# Altium PCB AFC_AVR.PcbDoc
Units mil, origin at the board's own origin, x right, y up, seen from the top; angles counter-clockwise.
Board outline 1560 x 2150 mil, 2 copper layers (Top Layer, Bottom Layer); 18 components, 14 nets, 95 pads, 2 vias.
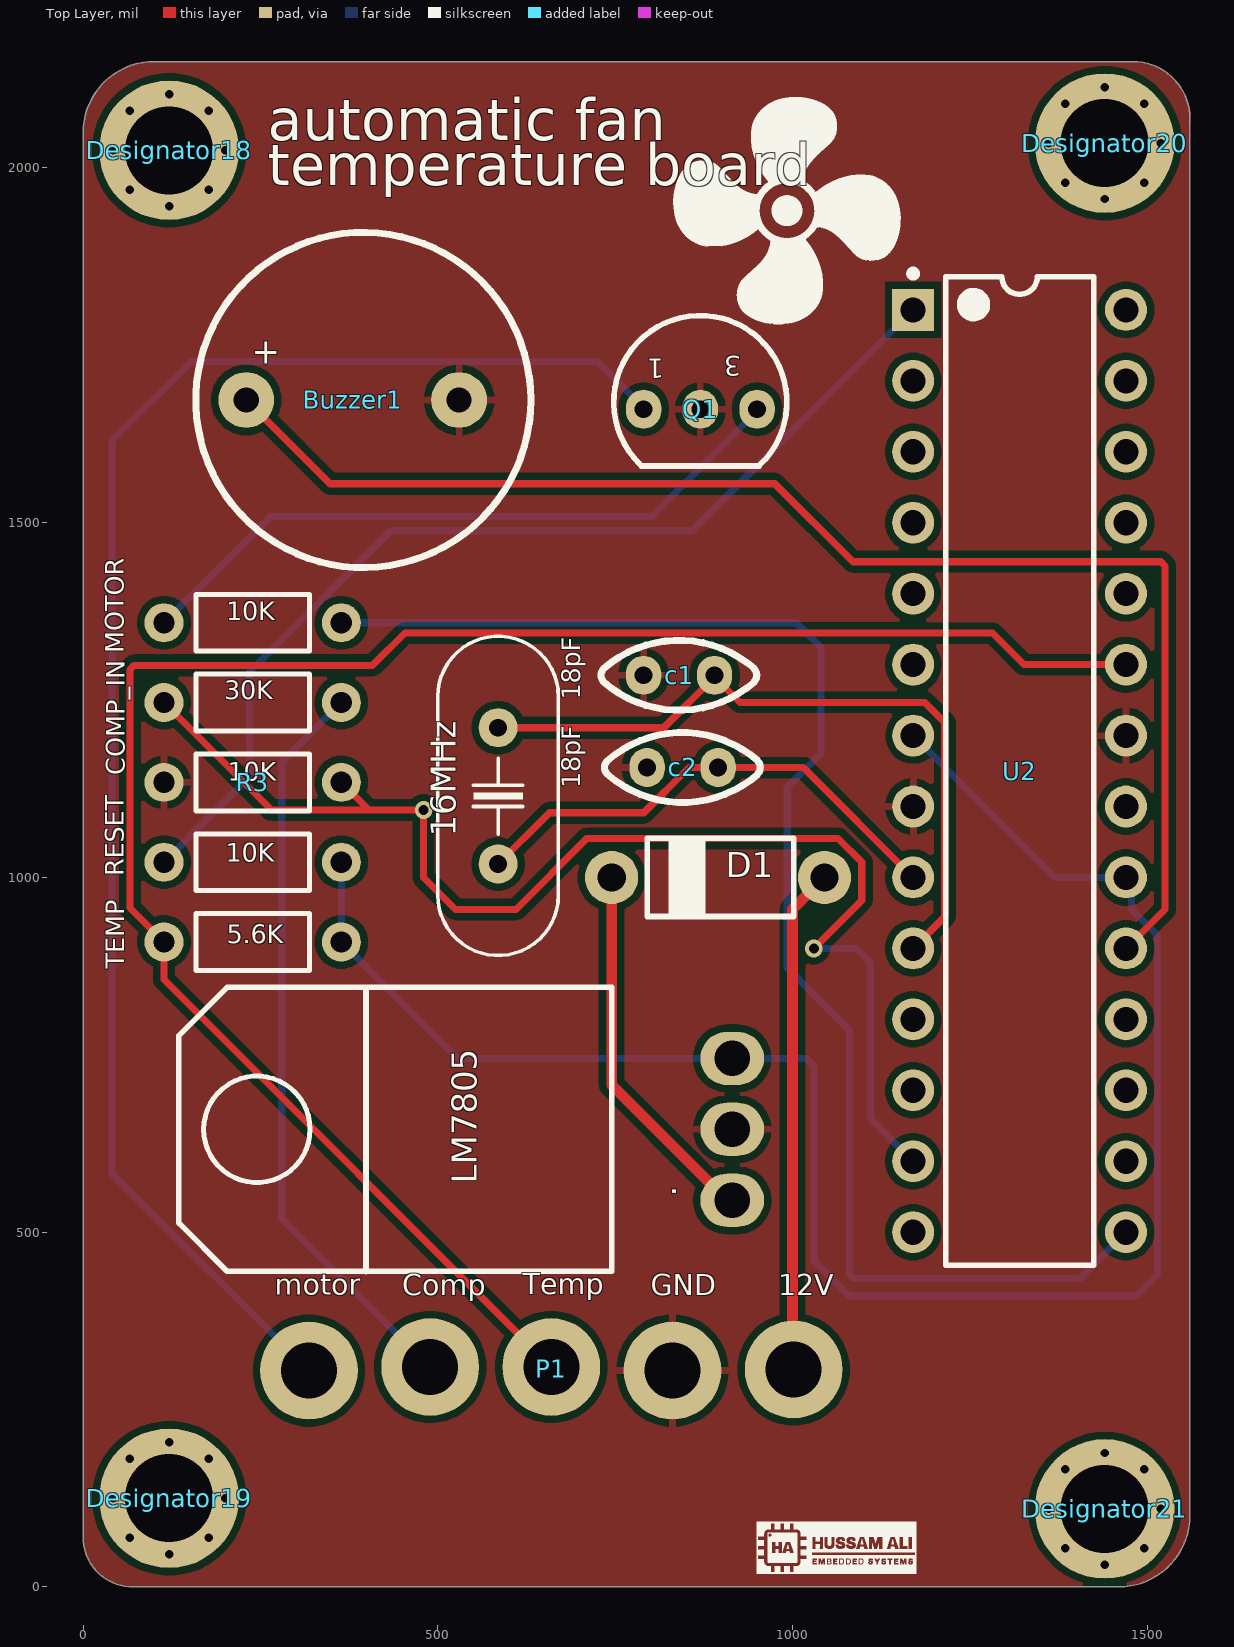
[diagram p0: Top Layer view]
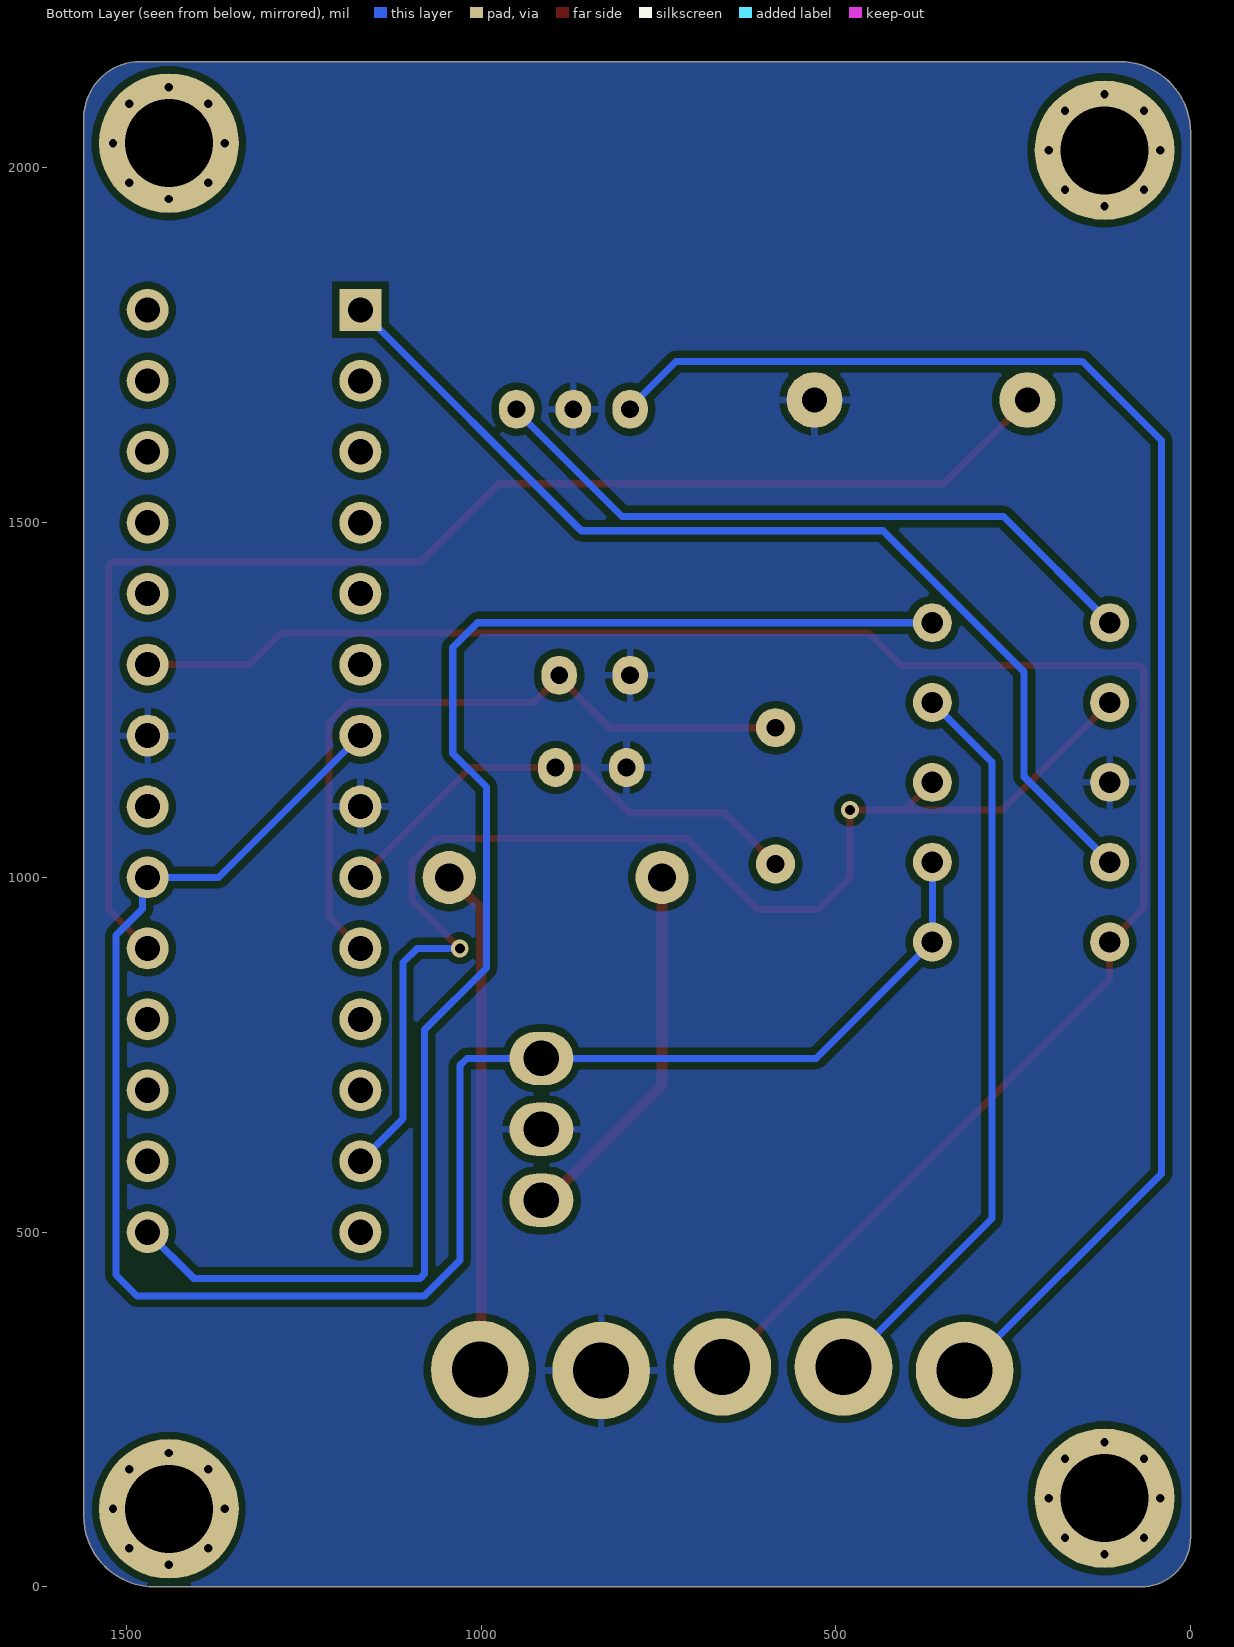
[diagram p1: Bottom Layer view, seen from below]
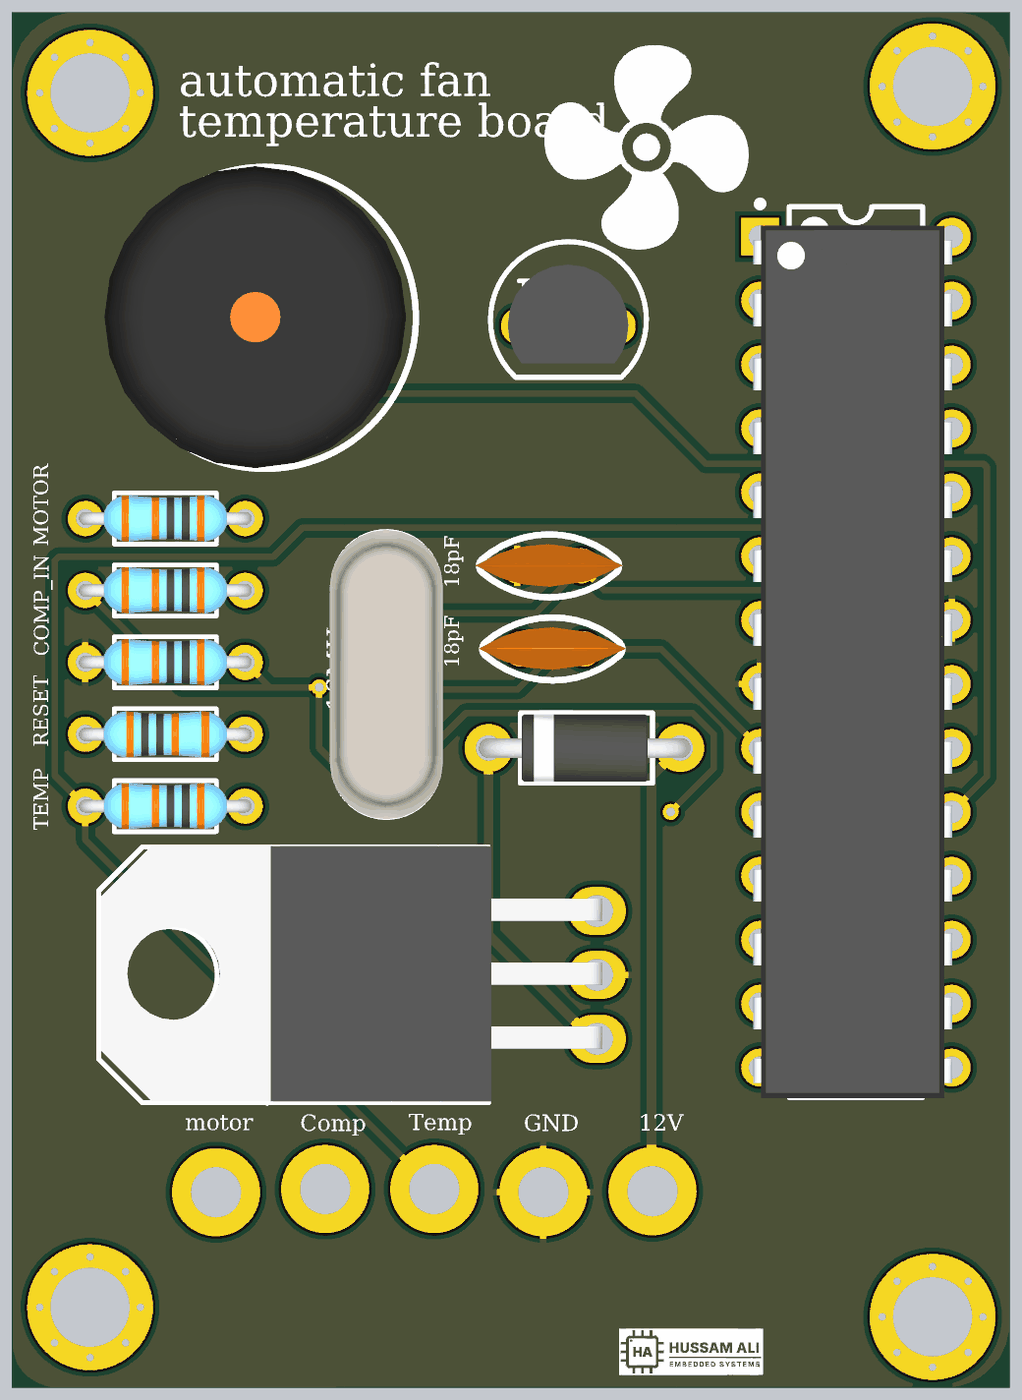
[diagram p2: 3D render of the assembled board from above, using the file's embedded part models]

## Layer stack, top to bottom
Top Solder: solder mask 0.4, Solder Resist, Dk 3.5
Top Layer: signal copper 1.4
Dielectric 1: dielectric 12.6, FR-4, Dk 4.8
Bottom Layer: signal copper 1.4
Bottom Solder: solder mask 0.4, Solder Resist, Dk 3.5

## Board outline
0,2050 cw(c100,2050) 100,2150 1480,2150 cw(c1480,2070) 1560,2070 1560,100 cw(c1460,100) 1460,0 110,0 70,0 cw(c70,70) 0,70

## Design rules (kind name [scope] priority, off if disabled: settings)
Clearance [All] p1: gap=10 ignorepadtopadclearanceinfootprint=FALSE
HoleSize [All] p1: absolutevalues=TRUE maxlimit=200 minlimit=1 maxpercent=80.000 minpercent=20.000
HoleToHoleClearance [All] p1: gap=1 allowstackedmicrovias=TRUE
MinimumSolderMaskSliver [All] p1: minsoldermaskwidth=1
PolygonConnect [All] p1: connectstyle=Relief reliefconductorwidth=10 reliefentries=4 polygonreliefangle="90 Angle" airgapwidth=10
RoutingVias [All] p1: holewidth=14 width=25 viastyle="Through Hole" minholewidth=14 minwidth=25 maxholewidth=14 maxwidth=25
SilkToSilkClearance [All] p1: silktosilkclearance=1
SilkToSolderMaskClearance [IsPad] p1: minsilkscreentomaskgap=1 clearancetoexposedcopper=TRUE
SolderMaskExpansion [All] p1: expansion=4 istentingtop=FALSE
Width [All] p1: maxlimit=35 minlimit=10 preferedwidth=10 minimp=50.000000 maximp=50.000000 favimp=50.000000
25 further rules are at their usual default settings.

## Classes and differential pairs
component class AFC_AVR: 16MHz Buzzer1 c1 c2 COMP_IN D1 LM7805 MOTOR P1 Q1 R3 RESET TEMP U2

## Components (designator, comment, footprint, x,y, rotation, side; value= is the part's Value field where it differs from the comment)
16MHz "11.0592 MHz" "XTAL Small" 585,1115 r270 top
Buzzer1 "Buzzer" BUZZER 395,1673 r0 top
c1 "18pF" "Cap - 100nF" 840,1285 r180 top
c2 "18pF" "Cap - 100nF" 845,1155 r180 top
COMP_IN "30K" Res-(1/4) 239,1246.5 r180 top (schematic designator R4)
D1 "1N4148" Diode-1n4001 1045,1000 r180 top
Designator18 "Comment" "Board Screw_No Silk" 121.26,2025 r0 top
Designator19 "Comment" "Board Screw_No Silk" 121.26,125 r0 top
Designator20 "Comment" "Board Screw_No Silk" 1440,2035 r0 top
Designator21 "Comment" "Board Screw_No Silk" 1440,110 r0 top
LM7805 "L78XXCV" "78XXCV - Right" 915,645 r90 top
MOTOR "10K" Res-(1/4) 239,1359 r180 top (schematic designator R5)
P1 "Header 5" HDR1X5 1001.58,306.54 r180 top
Q1 "C945" C945 870,1660 r180 top
R3 "10K" Res-(1/4) 239,1134 r180 top
RESET "10K" Res-(1/4) 239,1021.5 r0 top (schematic designator R2)
TEMP "5.6K" Res-(1/4) 239,909 r180 top (schematic designator R1)
U2 "ATmega328-PU" 28P3 1320,1150 r0 top

## Footprints (in the part's own frame and the unit in brackets; to place one, negate y for a bottom-side part, rotate by r counter-clockwise, add the part's x,y. Pads: shape width x height; smd on the part's side, far side on the other; paste and mask are expansions set on the pad)
28P3 [mm] "28-Pin Plastic Dual In-Line Package (PDIP)"
  rect 1.5x1.5 hole 0.9: 1(-3.81,16.51)
  round 1.5 hole 0.9: 2(-3.81,13.97) 3(-3.81,11.43) 4(-3.81,8.89) 5(-3.81,6.35) 6(-3.81,3.81) 7(-3.81,1.27) 8(-3.81,-1.27) 9(-3.81,-3.81) 10(-3.81,-6.35) 11(-3.81,-8.89) 12(-3.81,-11.43) 13(-3.81,-13.97) 14(-3.81,-16.51) 15(3.81,-16.51) 16(3.81,-13.97) 17(3.81,-11.43) 18(3.81,-8.89) 19(3.81,-6.35) 20(3.81,-3.81) 21(3.81,-1.27) 22(3.81,1.27) 23(3.81,3.81) 24(3.81,6.35) 25(3.81,8.89) 26(3.81,11.43) 27(3.81,13.97) 28(3.81,16.51)
  silkscreen extent -3.93,-17.7 2.65,17.93, body extent -4.08,-17.72 3.82,16.95, height 4.57
"78XXCV - Right" [mil]
  oval 75x90 hole 50: 1(-100,0) 2(100,0) 3(0,0)
  silkscreen extent -201,170 200,780, body extent -198,-8 202,776, height 175
"Board Screw_No Silk" [mm]
  round 0.6 hole 0.3: S(-2,0) S(-1.414,-1.414) S(-1.414,1.414) S(0,-2) S(0,2) S(1.414,-1.414) S(1.414,1.414) S(2,0)
  round 5 hole 3.15 mask+0.1: S(0,0)
BUZZER [mm]
  round 2 hole 0.9: 1(-4.191,0) 2(3.429,0)
  silkscreen extent -6,-6 6,6, body extent -6.38,-5.97 5.62,6.02, height 9.53
C945 [mil]
  oval 50x55 hole 25: 1(80,0) 2(0,0) 3(-80,0)
  silkscreen extent -122,-132 122,80, body extent -94,-96 95,58, height 236
"Cap - 100nF" [mil]
  oval 50x55 hole 25: 1(-50,0) 2(50,0)
  silkscreen extent -110,-49 110,49, body extent -115,-34 115,33, height 272
Diode-1n4001 [mil]
  round 75 hole 40: 1(0,0) 2(300,0)
  silkscreen extent 43,-59 250,59, body extent -16,-52 315,53, height 131
HDR1X5 [mm]
  round 3.5 hole 2: 1(0,0) 2(4.338,0.039) 3(8.676,-0.088) 4(13.014,-0.088) 5(17.352,0.039)
Res-(1/4) [mil]
  round 55 hole 30: 1(-125,0) 2(125,0)
  silkscreen extent -80,-40 80,40, body extent -135,-36 135,36, height 115
"XTAL Small" [mil]
  round 55 hole 25: 1(-96.06,0) 2(96.06,0)
  silkscreen extent -225,-85 225,85, body extent -226,-89 226,89, height 140

## Part data
16MHz: library part XTAL, "XTAL Crystal", Company=E.P.I.L, Design Date=11/04/2011
c1 c2: library part Cap-Bipolar, "Bipolar Capacitor", Voltage=100V, Adding Date=1387/12/20, Designer="Saeid Jorablo", Organazation=ControTec
COMP_IN MOTOR R3 RESET TEMP: library part Resistor, "Resistor", Power="1/8 W", Tolerance=5%
D1: library part "Diode 1N4148", "High Conductance Fast Diode", Code_JEDEC=DO-204-AH, ComponentLink1Description="Manufacturer Link", ComponentLink1URL=http://www.fairchildsemi.com/, ComponentLink2Description=Datasheet, ComponentLink2URL=http://www.fairchildsemi.com/ds/1N%2F1N4148.pdf, DatasheetVersion=1997, LatestRevisionDate=17-Jul-2002, LatestRevisionNote="Re-released for DXP Platform.", PackageDescription="Diode, Axial; Body 3.8 x 1.9 mm (LxDia. max), Lead Dia. 0.53 mm (max)", PackageReference=DO-35, Published=8-Jun-2000, Publisher="Altium Limited"
LM7805: "Fixed Voltage Regulator", Adding Date=1387/01/06, Company=ControTec, Designer="Saeid Jorablo"
P1: "Header, 4-Pin", LatestRevisionDate=17-Jul-2002, LatestRevisionNote="Re-released for DXP Platform.", Publisher="Altium Limited"
Q1: "NPN Transistor", Company="IPA CO", Designer="Saeid Jorablo", Last Update Time=2008/08/04
U2: library part CMP-0095-00015-2, "8-bit AVR Microcontroller, 32KB Flash, 1KB EEPROM, 2KB SRAM, 28-pin PDIP, Industrial Grade (-40°C to 85°C)", ComponentLink1Description="Manufacturer URL", ComponentLink1URL=http://www.atmel.com/, ComponentLink2Description="ATmega48A/48PA/88A/88PA/168A/168PA/328/328P Datasheet", ComponentLink2URL=http://www.atmel.com/dyn/resources/prod_documents/8271.pdf, ComponentLink3Description="ATmega48A/48PA/88A/88PA/168A/168PA/328/328P Summary", ComponentLink3URL=http://www.atmel.com/dyn/resources/prod_documents/8271S.pdf, DatasheetVersion="revD, May-2011", PackageDescription="28-lead (0.300\"/7.62mm Wide) Plastic Dual Inline Package (PDIP)", PackageReference=28P3, PackageVersion="revB, Sep-2001", RevisionNote="DatasheetVersion updated. URLs added."
Buzzer1: ComponentLinkURL=www.picpars.com, Designer="Seyed Mohsen Ghasemain"

## Via types
v1: diameter 25, hole 14, Top Layer to Bottom Layer, 2 vias

## Nets (pads, with @x,y where several pads share a name; then routed paths per layer and width w, separated by ;. In a path a pad name is that pad's centre, name@x,y a point inside that pad or via, vN(x,y) a via of type N, cw(c..) or ccw(c..) an arc to the next point about the centre after c; other vN are vias at no path point)
12V: D1.1 P1.1 | length 712.8
  Top Layer w15: P1.1 1000,308.12 1000,955 D1.1
Compressor: COMP_IN.2 R3.1 U2.13 | length 1813.1
  Top Layer w10: COMP_IN.2 265.5,1095 403,1095 ; R3.1 403,1095 ; v1(1030,900) 1097.5,967.5 1097.5,1021.75 1064.25,1055 710,1055 610,955 525,955 480,1000 v1(480,1095) 403,1095
  Bottom Layer w10: v1(1030,900) 1090,900 1110,880 1110,660 U2.13
Compressor_in: COMP_IN.1 P1.4 | length 1058
  Bottom Layer w10: COMP_IN.1 280,1162.5 280,519.21 P1.4
GND: Buzzer1.2 c1.2 c2.2 LM7805.3 P1.2 Q1.2 R3.2 U2.8 U2.22
Motor: P1.5 Q1.1 | length 2250.4
  Bottom Layer w10: P1.5 41,582.42 41,1616 152.37,1727.37 725.13,1727.37 790,1662.5 Q1.1
Net16MHz_1: 16MHz.1 c1.1 U2.10 | length 1025
  Top Layer w10: 16MHz.1 818.56,1211.06 c1.1@890,1282.5 ; c1.1 c1.1@890,1282.5 ; U2.10 1214.53,944.53 1214.53,1218.44 1186.33,1246.65 925.85,1246.65 c1.1@890,1282.5
Net16MHz_2: 16MHz.2 c2.1 U2.9 | length 705.6
  Top Layer w10: 16MHz.2 657.34,1091.27 790.34,1091.27 854.07,1155 c2.1 1015,1155 U2.9
NetBuzzer1_1: Buzzer1.1 U2.19 | length 1953.8
  Top Layer w10: Buzzer1.1 348,1555 975,1555 1085,1445 1519.14,1445 1525,1439.14 1525,955 U2.19
NetD1_2: D1.2 LM7805.1 | length 529.8
  Top Layer w15: D1.2 745,707.5 907.5,545 LM7805.1
NetQ1_3: MOTOR.2 Q1.3 | length 962.1
  Bottom Layer w10: MOTOR.2 263.73,1508.73 801.23,1508.73 950,1657.5 Q1.3
NetR2_1: RESET.1 U2.1 | length 1464.9
  Bottom Layer w10: RESET.1 234.5,1142 234.5,1289.61 433.62,1488.73 858.73,1488.73 U2.1
NetR5_1: MOTOR.1 U2.15 | length 2049
  Bottom Layer w10: MOTOR.1 1005.14,1359 1040,1324.14 1040,1174.95 992.5,1127.45 992.5,872.5 1080,785 1080,440.86 1085.86,435 1405,435 U2.15
Temp_Sensor: P1.3 TEMP.2 U2.23 | length 2672.9
  Top Layer w10: P1.3 114,856 TEMP.2 66,957 66,1293.14 71.86,1299 408,1299 453.53,1344.53 1281.88,1344.53 1326.4,1300 U2.23
VCC: LM7805.2 RESET.2 TEMP.1 U2.7 U2.20 | length 2604.8
  Bottom Layer w10: RESET.2 TEMP.1 528,745 LM7805.2 1020,745 1030,735 1030,460 1080,410 1485,410 1514.53,439.53 1514.53,918.44 1477.5,955.47 1477.5,992.5 U2.20 1370,1000 U2.7
pads on no net: Designator18.S Designator19.S Designator20.S Designator21.S U2.2 U2.3 U2.4 U2.5 U2.6 U2.11 U2.12 U2.14 U2.16 U2.17 U2.18 U2.21 U2.24 U2.25 U2.26 U2.27 U2.28

## Polygon pours and split planes (outlines as drawn)
GND on Top Layer "GND_L01_P006" (solid, pour order 6): 89,2150 1488,2150 1507,2146 1525,2137 1536,2128 1551,2109 1561,2079 1560,2054 1560,88 1558,82 1555,67 1545,46 1539,39 1524,23 1515,16 1499,7 1486,3 1477,1 1466,1 60,0 52,2 39,7 26,15 16,24 7,37 1,57 0,64 0,2060 4,2078 6,2085 14,2103 28,2120 40,2131 52,2138 63,2144 76,2148 90,2151
GND on Bottom Layer "GND_L02_P000" (solid, pour order 0): 89,2150 1488,2150 1507,2146 1525,2137 1536,2128 1551,2109 1561,2079 1560,2054 1560,88 1558,82 1555,67 1545,46 1539,39 1524,23 1515,16 1499,7 1486,3 1477,1 1466,1 60,0 52,2 39,7 26,15 16,24 7,37 1,57 0,64 0,2060 4,2078 6,2085 14,2103 28,2120 40,2131 52,2138 63,2144 76,2148 90,2151

## Silkscreen, mask and mechanical layers (free items; w line width, h text height)
Top Overlay:
  drawing of 12 lines, arcs and shapes, not listed
  text "automatic fan" at 260,2019.96 h100
  text "temperature board" at 260,1956.43 h100
  text "motor" at 270,402.22 h50
  text "Temp" at 620,402.4 h50
  text "Comp" at 450,400.97 h50
  text "GND" at 800,400.97 h50
  text "12V" at 980,401.48 h50

## Text inside footprints (layer, text, board x,y; h text height)
Buzzer1: Top Overlay "+" at 237.52,1712.37 h60
Q1: Top Overlay "1" at 819,1731.26 h27.56 r180; Top Overlay "3" at 928,1735 h27.56 r180